# Altium PCB Dimmer-Sub-Board-v2.0.PcbDoc
Units mil, origin at the board's own origin, x right, y up, seen from the top; angles counter-clockwise.
Board outline 1968.5 x 4330.71 mil, 2 copper layers (Top Layer, Bottom Layer), stack 61.811 mil thick; 12 components, 10 nets, 37 pads, 0 vias.
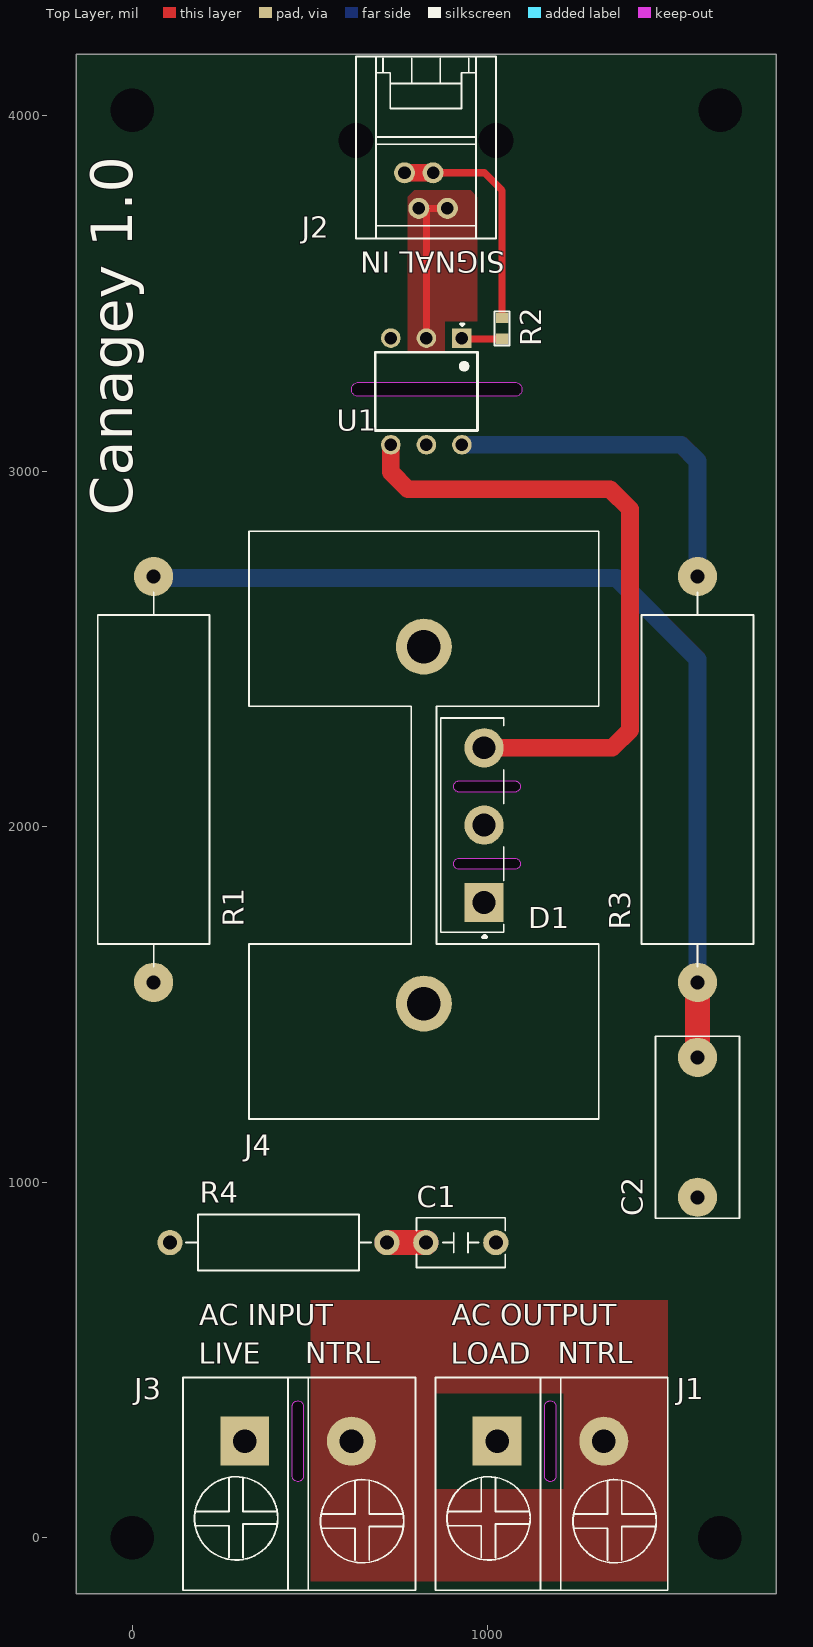
[diagram p0: Top Layer view]
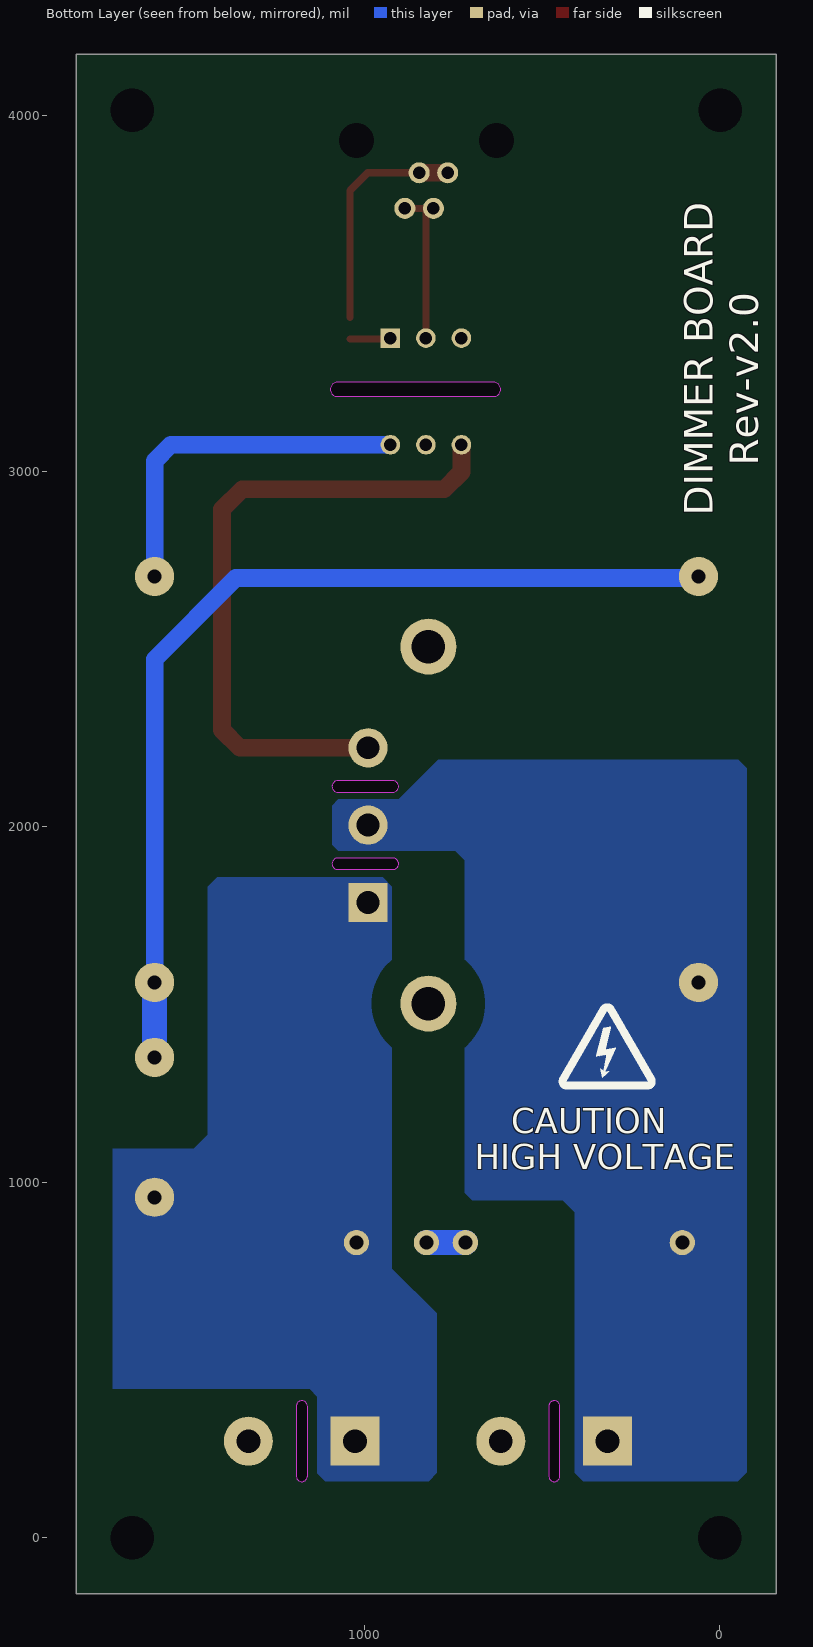
[diagram p1: Bottom Layer view, seen from below]
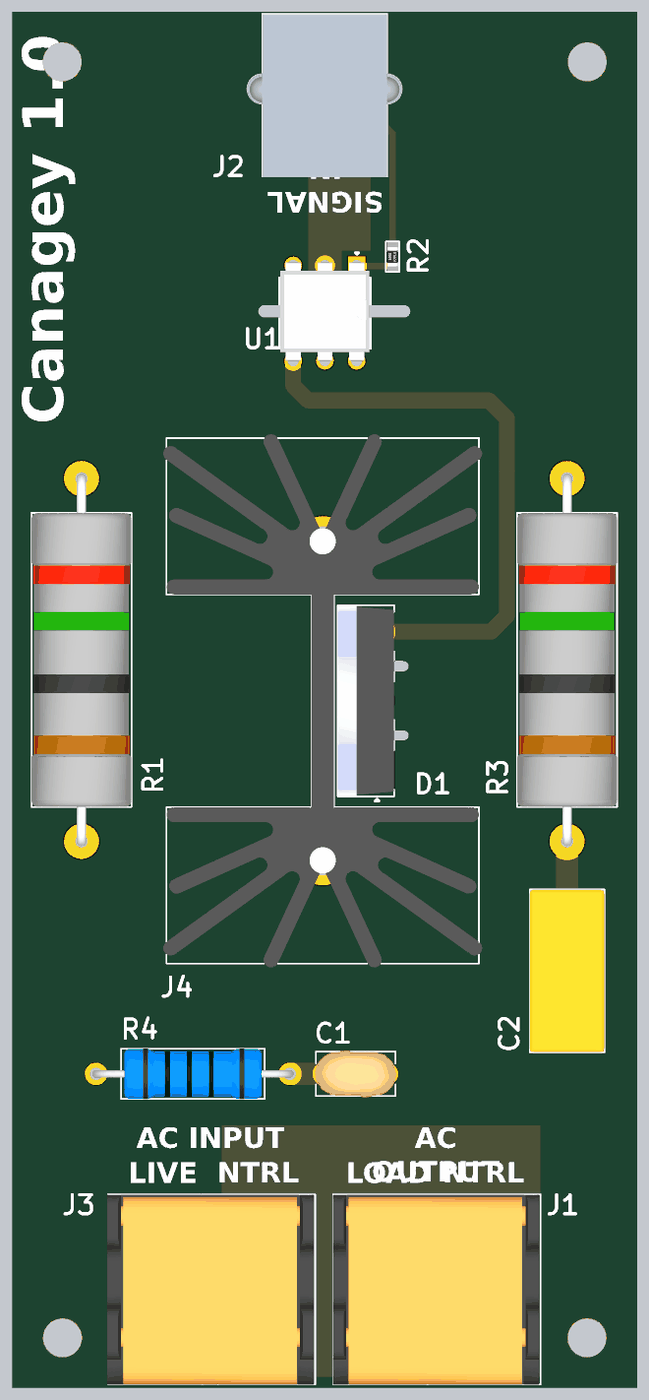
[diagram p2: 3D render of the assembled board from above, using the file's embedded part models]

## Layer stack, top to bottom
Top Solder: solder mask 0.394, Solder Resist, Dk 3.5
Top Layer: signal copper 1.378
Dielectric 1: dielectric 59.055, FR-4, Dk 4.6
Bottom Layer: signal copper 1.378
Bottom Solder: solder mask 0.394, Solder Resist, Dk 3.5

## Board outline
-157.85,-157.11 -157.85,4173.6 1810.66,4173.6 1810.66,-157.11
cut-out: 919.62,1880.49 cw(c919.62,1896.24) 903.87,1896.24 cw(c919.62,1896.24) 919.62,1911.99 1075.55,1911.99 cw(c1075.55,1896.24) 1091.3,1896.24 cw(c1075.55,1896.24) 1075.55,1880.49
cut-out: 919.62,2098.01 cw(c919.62,2113.76) 903.87,2113.76 cw(c919.62,2113.76) 919.62,2129.51 1075.55,2129.51 cw(c1075.55,2113.76) 1091.3,2113.76 cw(c1075.55,2113.76) 1075.55,2098.01
cut-out: 1191.5,174.22 cw(c1175.75,174.22) 1175.75,158.47 cw(c1175.75,174.22) 1160,174.22 1160,370.16 cw(c1175.75,370.16) 1175.75,385.9 cw(c1175.75,370.16) 1191.5,370.16
cut-out: 481.5,174.22 cw(c465.75,174.22) 465.75,158.47 cw(c465.75,174.22) 450,174.22 450,370.16 cw(c465.75,370.16) 465.75,385.9 cw(c465.75,370.16) 481.5,370.16
cut-out: 636.39,3211.03 cw(c636.39,3230.72) 616.7,3230.72 cw(c636.39,3230.72) 636.39,3250.4 1076.39,3250.4 cw(c1076.39,3230.72) 1096.07,3230.72 cw(c1076.39,3230.72) 1076.39,3211.03

## Design rules (kind name [scope] priority, off if disabled: settings)
BoardOutlineClearance [All] p1: gap=0 ignorepadtopadclearanceinfootprint=FALSE except(10: Arc-OutlineEdge SMDPad-OutlineEdge THPad-OutlineEdge Via-OutlineEdge Fill-OutlineEdge Poly-OutlineEdge)
Clearance Clearance_DIFF [InAnyDifferentialPair] p1: gap=10 ignorepadtopadclearanceinfootprint=FALSE except(6: Arc-SMDPad Track-SMDPad SMDPad-SMDPad; 7: Arc-Track Arc-Fill Track-Track Track-Via Track-Fill Track-Region Track-Text SMDPad-Fill SMDPad-Region THPad-THPad Fill-Fill; 8: Region-Region; 20: THPad-Poly Fill-Poly Poly-Poly Poly-Region)
Clearance [All] p2: gap=10 ignorepadtopadclearanceinfootprint=FALSE except(4: SMDPad-SMDPad; 6: Arc-SMDPad Track-SMDPad; 7: Arc-Track Arc-Fill Track-Track Track-Via Track-Fill Track-Region Track-Text SMDPad-Fill SMDPad-Region THPad-THPad Fill-Fill; 8: Region-Region; 20: THPad-Poly Fill-Poly Poly-Poly Poly-Region)
DiffPairsRouting DIFF_CAN1 [InDifferentialPairClass('DIFF_CAN')] p1: maxlimit=7 minlimit=7 mostfreqgap=7 toplayer_minwidth=7 toplayer_maxwidth=7 toplayer_prefwidth=7 bottomlayer_minwidth=7 bottomlayer_maxwidth=7 bottomlayer_prefwidth=7 impedanceprofiledriven=TRUE impedanceprofileid={AF431588-A3C0-40A6-A26B-CB03469C8758} impedanceprofilevalue=120.000000 maxuncoupledlength=500
DiffPairsRouting DIFF_RS485 [InDifferentialPairClass('DIFF_RS485')] p2: maxlimit=7 minlimit=7 mostfreqgap=7 toplayer_minwidth=7 toplayer_maxwidth=7 toplayer_prefwidth=7 bottomlayer_minwidth=7 bottomlayer_maxwidth=7 bottomlayer_prefwidth=7 impedanceprofiledriven=TRUE impedanceprofileid={AF431588-A3C0-40A6-A26B-CB03469C8758} impedanceprofilevalue=120.000000 maxuncoupledlength=500
HoleSize [All] p1: absolutevalues=TRUE maxlimit=137.8 minlimit=1 maxpercent=80.000 minpercent=20.000
MinimumSolderMaskSliver [All] p1: minsoldermaskwidth=0
PolygonConnect [All] p1: connectstyle=Direct reliefconductorwidth=10 reliefentries=4 polygonreliefangle="90 Angle" airgapwidth=10
RoutingVias [All] p1: holewidth=11.81 width=23.62 viastyle="Through Hole" minholewidth=7.87 minwidth=15.75 maxholewidth=11.81 maxwidth=23.62
SilkToSilkClearance [All] p1: silktosilkclearance=0
SilkToSolderMaskClearance [IsPad] p1: minsilkscreentomaskgap=0 clearancetoexposedcopper=TRUE
SolderMaskExpansion [All] p1: expansion=4 istentingtop=FALSE
SupplyNets "Schematic Supply Nets_2" [InNet('NEUTRAL')] p1: voltage=0.000
SupplyNets "Schematic Supply Nets_1" [InNet('LIVE')] p2: voltage=0.000
SupplyNets "Schematic Supply Nets" [InNet('LOAD')] p3: voltage=0.000
SupplyNets "Schematic Supply Nets_7" [InNet('GND')] p4: voltage=0.000
Width [All] p1: maxlimit=100 minlimit=4 preferedwidth=6 minimp=50.000000 maximp=50.000000 favimp=50.000000
25 further rules are at their usual default settings.

## Components (designator, comment, footprint, x,y, rotation, side; value= is the part's Value field where it differs from the comment)
C1 "10nF" KP103J2G0501 924,830.78 r180 top
C2 "47nF" MMKP473J2J1001 1590,1155 r270 top
D1 "BTA41-600BRG" TOP3 989.62,2005 r90 top locked
J1 "DBT50G-7.62-2P-BK-P" DBT50G-7.62-2P-BK-P 1176.26,272.19 r0 top locked
J2 "R-RJ11R04P-A802" R-RJ11R04P-A802 825.92,3835.28 r180 top locked
J3 "DBT50G-7.62-2P-BK-P" DBT50G-7.62-2P-BK-P 466.26,272.19 r0 top locked
J4 "XSD366-094" XSD366-094 820,2005 r270 top locked
R1 "450R" EWWR0006J450RT9 60,2133.66 r270 top
R2 "470R" Res-0603 1040,3402.44 r270 top
R3 "390R" EWWR0006J390RT9 1590,2133.66 r270 top
R4 "39R" MFR2WSJT-73-39R 411,830.78 r180 top
U1 "MOC3023M" "6 Pin Dip" 827,3225 r270 top

## Footprints (in the part's own frame and the unit in brackets; to place one, negate y for a bottom-side part, rotate by r counter-clockwise, add the part's x,y. Pads: shape width x height; smd on the part's side, far side on the other; paste and mask are expansions set on the pad)
"6 Pin Dip" [mm]
  rect 1.4x1.4 hole 0.9: 1(-3.81,2.54)
  round 1.4 hole 0.9: 2(-3.81,0) 3(-3.81,-2.54) 4(3.81,-2.54) 5(3.81,0) 6(3.81,2.54)
  silkscreen extent -4.83,-3.65 2.8,3.65, body extent -4.06,-3.56 3.81,3.56, height 4.8
DBT50G-7.62-2P-BK-P [mm]
  rect 3.5x3.5 hole 1.7: 1(-3.81,0)
  round 3.5 hole 1.7: 2(3.81,0)
  silkscreen extent -8.22,-10.65 8.38,4.55, body extent -8.25,-10.67 8.25,4.53, height 16.3
EWWR0006J390RT9 [mm]
  round 2.8 hole 1: 1(-14.5,0) 2(14.5,0)
  silkscreen extent -13.37,-4 13.37,4, body extent -14.87,-3.99 14.87,3.99, height 8
EWWR0006J450RT9 [mm]
  round 2.8 hole 1: 1(-14.5,0) 2(14.5,0)
  silkscreen extent -13.37,-4 13.37,4, body extent -14.87,-3.99 14.87,3.99, height 8
KP103J2G0501 [mm]
  round 1.8 hole 1 paste-2539.97 mask+0.05: 1(-2.5,0) 2(2.5,0)
  silkscreen extent -3.18,-1.78 3.17,1.78, body extent -3.25,-1.88 3.25,1.88, height 9.75
MFR2WSJT-73-39R [mm]
  round 1.8 hole 1 paste-2539.97 mask+0.051: 1(-7.75,0) 2(7.75,0)
  silkscreen extent -6.61,-2 6.6,2, body extent -8.05,-2 8.05,2, height 4.01
MMKP473J2J1001 [mm]
  round 2.8 hole 1: 1(-5,0) 2(5,0)
  silkscreen extent -6.5,-3 6.5,3, body extent -6.5,-3 6.5,3, height 12
R-RJ11R04P-A802 [mm]
  round 1.5 hole 0.9 paste-2539.97 mask+0.051: 1(1.53,-0.12) 2(0.51,2.42) 3(-0.51,-0.12) 4(-1.53,2.42)
  round 0 hole 2.5 unplated paste-2539.97: ""(-5,-2.42) ""(5,-2.42)
  silkscreen extent -5,-8.42 5,4.59, body extent -6.14,-8.37 6.14,4.63, height 14.55
Res-0603 [mil]
  rect 30x35 smd: 1(-30,0) 2(30,0)
  silkscreen extent -48,-21 48,21, body extent -31,-17 31,17, height 18
TOP3 [mm]
  rect 2.8x2.8 hole 1.63: 1(-5.525,0)
  round 2.8 hole 1.63: 2(0,0) 3(5.525,0)
  silkscreen extent -8.01,-1.4 7.65,3.1, body extent -7.65,-1.4 7.65,3.1, height 21.1
XSD366-094 [mm]
  round 4 hole 2.4 paste-2539.97 mask+0.102: 1(-12.75,0) 2(12.75,0)
  silkscreen extent -21,-12.5 21,12.5, body extent -21.31,-12.76 21.31,12.76, height 25.3

## Part data
C1: library part KP103J2G0501, "10nF -40℃~+100℃ ±5% 400V Plugin,P=5mm Polypropylene Film Capacitors (CBB) ROHS", LCSC Part Number=C3019055, Manufacturer=KYET, Package=Plugin,P=5mm, ComponentLink1Description=LCSC, ComponentLink1URL=https://www.lcsc.com/product-detail/Polypropylene-Film-Capacitors-CBB_KYET-KP103J2G0501_C3019055.html, Item Type=Capacitor, Manufacturer Part Number=KP103J2G0501
C2: library part MMKP473J2J1001, "47nF -40℃~+105℃ ±5% 630V Plugin,P=10mm Polypropylene Film Capacitors (CBB) ROHS", LCSC Part Number=C484939, Manufacturer=KYET, ComponentLink1Description="New link", ComponentLink1URL=https://www.lcsc.com/product-detail/Polypropylene-Film-Capacitors-CBB_KYET-MMKP473J2J1001_C484939.html, Item Type=Capacitor, Manufacturer Part Number=MMKP473J2J1001, Pricing="5=0.1166, 50=0.0957, 150=0.0852, 500=0.0684, 2500=0.0622, 5000=0.059 (USD)", Stock=4295, Supplier=LCSC
D1: "80mA 50mA 600V TOP-3 Thyristors (SCR)/Modules ROHS", LCSC Part Number=C9103, Manufacturer=STMicroelectronics, Package=TOP-3, ComponentLink1Description="LCSC Link", ComponentLink1URL=https://www.lcsc.com/product-detail/Thyristors-SCR-Modules_STMicroelectronics-BTA41-600BRG_C9103.html, Item Type=Thyristors, Manufacturer Part Number=BTA41-600BRG
J1 J3: "1x2P Corner With Cover Plate 2 1 7.62mm -40℃~+105℃ 20A 300V Black 12~22 Straight Needle Plugin,P=7.62mm Barrier Terminal Blocks ROHS", LCSC Part Number=C496127, Manufacturer=DORABO, Package=Plugin,P=7.62mm, ComponentLink1Description=LCSC, ComponentLink1URL=https://www.lcsc.com/product-detail/Barrier-Terminal-Blocks_DORABO-DBT50G-7-62-2P-BK-P_C496127.html, Item Type="Terminal Block", Manufacturer Part Number=DBT50G-7.62-2P-BK-P
J2: "RJ11Receptacle 1 Plugin Ethernet Connectors / Modular Connectors (RJ45 RJ11) ROHS", LCSC Part Number=C189737, Manufacturer="Ckmtw(Shenzhen Cankemeng)", Package=Plugin, ComponentLink1Description=LCSC, ComponentLink1URL=https://www.lcsc.com/product-detail/Ethernet-Connectors-Modular-Connectors-RJ45-RJ11_Ckmtw-Shenzhen-Cankemeng-R-RJ11R04P-A802_C189737.html, Item Type="(RJ45 RJ11)", Manufacturer Part Number=R-RJ11R04P-A802
J4: "42*25*25MM Heat sink/heatsink", LCSC Part Number=C286227, Manufacturer=XSD, Package=Custom, ComponentLink1Description=LCSC, ComponentLink1URL=https://www.lcsc.com/product-detail/Heat-sink-heatsink_XSD-XSD366-094_C286227.html, Item Type=Heatsink, Manufacturer Part Number=XSD366-094
R1: library part EWWR0006J450RT9, "Wirewound Resistors 450Ω 6W ±250ppm/℃ ±5% Plugin,D8xL23.5mm Through Hole Resistors ROHS", LCSC Part Number=C348984, Manufacturer=RESI, Package=Plugin,D8xL23.5mm, ComponentLink1Description=LCSC, ComponentLink1URL=https://www.lcsc.com/product-detail/Through-Hole-Resistors_RESI-EWWR0006J450RT9_C348984.html, Item Type=Resistor, Manufacturer Part Number=EWWR0006J450RT9
R2: library part RC0603FR-07470RL, "RES 470 OHM 1% 1/10W 0603", Case Code (Imperial)=0603, Case Code (Metric)=1608, LCSC Part Number=C114669, Manufacturer=Yageo, Max Operating Temperature=155°C, Max Power Dissipation=100mW, Min Operating Temperature=-55°C, Package Quantity=1, Resistance Tolerance=1%, Resistor Type="Thick Film", Supplier Part Number 1=311-470HRCT-ND, Temperature Coefficient=100ppm/°C, Voltage Rating=50V, Working Voltage=75V, Case/Package=0603, Category="Chip SMD Resistors", ComponentLink1Description=https://datasheet.ciiva.com/11808/0900766b80f96399-11808177.pdf?src-supplier=RSComponents, ComponentLink1URL=https://datasheet.ciiva.com/11808/0900766b80f96399-11808177.pdf?src-supplier=RSComponents, ComponentLink2Description=https://datasheet.ciiva.com/7746/1738695-7746359.pdf?src-supplier=Element14, ComponentLink2URL=https://datasheet.ciiva.com/7746/1738695-7746359.pdf?src-supplier=Element14, ComponentLink3Description=https://datasheet.ciiva.com/7746/1738695-7746360.pdf?src-supplier=Element14, ComponentLink3URL=https://datasheet.ciiva.com/7746/1738695-7746360.pdf?src-supplier=Element14, ComponentLink4Description=https://datasheet.ciiva.com/7660/1868787-7660793.pdf?src-supplier=Element14, ComponentLink4URL=https://datasheet.ciiva.com/7660/1868787-7660793.pdf?src-supplier=Element14, ComponentLink5Description=https://datasheet.ciiva.com/46440/1868787-46440907.pdf?src-supplier=Element14, ComponentLink5URL=https://datasheet.ciiva.com/46440/1868787-46440907.pdf?src-supplier=Element14, ComponentLink6Description=https://datasheet.ciiva.com/2454/pyu-r-int-thick-7-2454012.pdf?src-supplier=Digi-Key, ComponentLink6URL=https://datasheet.ciiva.com/2454/pyu-r-int-thick-7-2454012.pdf?src-supplier=Digi-Key, ComponentLink7Description=https://datasheet.ciiva.com/2454/pyu-r-int-thick-7-2454013.pdf?src-supplier=Digi-Key, ComponentLink7URL=https://datasheet.ciiva.com/2454/pyu-r-int-thick-7-2454013.pdf?src-supplier=Digi-Key, ComponentLink8Description=https://datasheet.ciiva.com/2454/pyu-r-int-thick-7-2454014.pdf?src-supplier=Digi-Key, ComponentLink8URL=https://datasheet.ciiva.com/2454/pyu-r-int-thick-7-2454014.pdf?src-supplier=Digi-Key, Construction=Rectangular, Depth=0.8mm, Features="Moisture Resistant", Height=0.022inch, Lead Free="Lead Free", Length=1.6mm, Manufacturer Part Number=RC0603FR-07470RL, Military Standard=Not, Number of Terminations=2, Packaging="Tape and Reel", Power Rating=100mW, Pricing 1="1=0.10000, 10=0.02400, 100=0.00970, 1000=0.00436, 2500=0.00378 (USD)", REACH SVHC="No SVHC", Resistance=470R, RoHS=Yes, RoHS Compliant=Yes, Series=RC, Stock 1=154083, Supplier 1=Digi-Key, Technology="THICK FILM", Termination=SMD/SMT, Tolerance=1%, Width=0.031inch
R3: library part EWWR0006J390RT9, "Wirewound Resistors 390Ω 6W ±250ppm/℃ ±5% Plugin,D8xL23.5mm Through Hole Resistors ROHS", LCSC Part Number=C348979, Manufacturer=RESI, Package=Plugin,D8xL23.5mm, ComponentLink1Description=LCSC, ComponentLink1URL=https://www.lcsc.com/product-detail/Through-Hole-Resistors_RESI-EWWR0006J390RT9_C348979.html, Item Type=Resistor, Manufacturer Part Number=EWWR0006J390RT9
R4: library part MFR2WSJT-73-39R, "Metal Film Resistors 39Ω 2W ±5% Plugin,D4.5xL11.5mm Through Hole Resistors ROHS", LCSC Part Number=C176578, Manufacturer=YAGEO, Package=Plugin,D4.5xL11.5mm, ComponentLink1Description=LCSC, ComponentLink1URL=https://www.lcsc.com/product-detail/Through-Hole-Resistors_YAGEO-MFR2WSJT-73-39R_C176578.html, Item Type=Resistor, Manufacturer Part Number=MFR2WSJT-73-39R
U1: "OPTOISOLATOR 4.17KV TRIAC 6DIP", LCSC Part Number=C5240, Manufacturer="ON Semiconductor / Fairchild", ComponentLink1Description=https://datasheet.ciiva.com/15118/getdatasheetpartid-110426-15118245.pdf?src-supplier=Verical, ComponentLink1URL=https://datasheet.ciiva.com/15118/getdatasheetpartid-110426-15118245.pdf?src-supplier=Verical, ComponentLink2Description=https://datasheet.ciiva.com/8074/1806097-8074079.pdf?src-supplier=Element14, ComponentLink2URL=https://datasheet.ciiva.com/8074/1806097-8074079.pdf?src-supplier=Element14, ComponentLink3Description=https://datasheet.ciiva.com/8084/moc3023m-8084955.pdf?src-supplier=Avnet, ComponentLink3URL=https://datasheet.ciiva.com/8084/moc3023m-8084955.pdf?src-supplier=Avnet, ComponentLink4Description=https://datasheet.ciiva.com/2092/moc3010m-2092979.pdf?src-supplier=Digikey, ComponentLink4URL=https://datasheet.ciiva.com/2092/moc3010m-2092979.pdf?src-supplier=Digikey, Item Type=IC, Manufacturer Part Number=MOC3023M, Pricing="1=0.215, 200=0.205, 750=0.196, 2500=0.19, 10000=0.176 (USD)", RoHS=Yes, Stock=46500, Supplier="Future Electronics"

## Free pads (board coordinates)
  round 0 hole 122.05: MH1(-0.74,4015.75) MH1(0,0) MH1(1652.81,0) MH1(1653.54,4015.75)

## Nets (pads, with @x,y where several pads share a name; then routed paths per layer and width w, separated by ;. In a path a pad name is that pad's centre, name@x,y a point inside that pad or via, vN(x,y) a via of type N, cw(c..) or ccw(c..) an arc to the next point about the centre after c; other vN are vias at no path point)
GND: J2.2 J2.4 U1.2 | length 445.3
  Top Layer w20: J2.2 J2.2@827,3740 ; U1.2 J2.2@827,3740 ; J2.4 J2.2@827,3740
LIVE: D1.2 J3.1 R1.2 R4.2
LOAD: C1.1 C2.2 D1.1 J1.1
NetC1_2: C1.2 R4.1 | length 218.9
  Top Layer w70: R4.1 C1.2
  Bottom Layer w70: R4.1 C1.2
NetC2_1: C2.1 R1.1 R3.2 | length 2940.7
  Top Layer w70: C2.1 R3.2@1590,1548.03
  Bottom Layer w50: R1.1@60,2700 1361.93,2700 1590,2471.93 R3.2
  Bottom Layer w70: C2.1 R3.2
NetD1_3: D1.3 U1.4 | length 1845.8
  Top Layer w50: U1.4 727,2998.1 775.1,2950 1343.62,2950 1400.26,2893.36 1400.26,2272.49 1350.3,2222.52 D1.3
NetR2_2: R2.2 U1.1 | length 114.1
  Top Layer w20: U1.1 929.56,3372.44 R2.2
NetR3_1: R3.1 U1.6 | length 1006.8
  Bottom Layer w50: U1.6 1544.39,3075 1590,3029.39 R3.1
NEUTRAL: J1.2 J3.2
TRIG: J2.1 J2.3 R2.1 | length 652.5
  Top Layer w20: J2.3 990.71,3840 1040,3790.71 R2.1@1040,3432.96
  Top Layer w50: J2.1 J2.3
pads on no net: J2. J4.1 J4.2 U1.3 U1.5
copper on no net: | length 0

## Polygon pours and split planes (outlines as drawn)
GND on Top Layer "GND_L01_P003" (solid, remove dead copper, pour order 3): 970.7,3335.24 970.7,3771.87 952.2,3790.37 792.9,3790.37 774.97,3772.44 774.97,3335.24
NEUTRAL on Top Layer "NEUTRAL_L01_P001" (solid, pour order 1): 502.01,668.6 502.01,-122.05 1506.18,-122.05 1506.18,668.6
LOAD on Bottom Layer "LOAD_L02_P000" (solid, pour order 0): 922.6,1831.96 948.91,1858.27 1413.39,1858.27 1440,1831.65 1440,1134.11 1480,1094.11 1708.11,1094.11 1708.11,420 1154.41,420 1132.18,397.77 1132.18,182.4 1109.78,160 819.22,160 796.18,183.04 796.18,631.34 922.6,757.76
LIVE on Bottom Layer "LIVE_L02_P002" (solid, pour order 2): 1073.05,1933.07 1090.55,1950.57 1090.55,2060.12 1073.05,2077.62 903.65,2077.62 792.39,2188.87 -52.17,2188.87 -75.91,2165.13 -75.91,185.34 -50.57,160 384.31,160 408.02,183.72 408.02,915.78 442.24,950 696.11,950 717.4,971.29 717.4,1905.62 744.85,1933.07

## Other copper
Top Layer:
  pour cut-out: 852.64,138.08 852.64,406.3 1212.03,406.3 1212.03,138.08
Bottom Layer:
  pour cut-out: 659.53,2506.97 ccw(c820,2506.97) 820,2346.5 ccw(c820,2506.97) 980.47,2506.97 ccw(c820,2506.97) 820,2667.44 ccw(c820,2506.97)
  pour cut-out: 659.53,1503.03 ccw(c820,1503.03) 820,1342.56 ccw(c820,1503.03) 980.47,1503.03 ccw(c820,1503.03) 820,1663.5 ccw(c820,1503.03)
  pour cut-out: 1207.78,272.19 ccw(c1326.26,272.19) 1326.26,153.71 ccw(c1326.26,272.19) 1444.74,272.19 ccw(c1326.26,272.19) 1326.26,390.66 ccw(c1326.26,272.19)
  pour cut-out: 1653.54,4133.86 cw(c1653.54,4015.75) 1771.65,4015.75 cw(c1653.54,4015.75) 1653.54,3897.64 cw(c1653.54,4015.75) 1535.43,4015.75 cw(c1653.54,4015.75)
  pour cut-out: 1770.92,0 cw(c1652.81,0) 1652.81,-118.11 cw(c1652.81,0) 1534.7,0 cw(c1652.81,0) 1652.81,118.11 cw(c1652.81,0)
  pour cut-out: -118.11,0 ccw(c0,0) 0,-118.11 ccw(c0,0) 118.11,0 ccw(c0,0) 0,118.11 ccw(c0,0)
  pour cut-out: -118.85,4015.75 ccw(c-0.74,4015.75) -0.74,3897.64 ccw(c-0.74,4015.75) 117.37,4015.75 ccw(c-0.74,4015.75) -0.74,4133.86 ccw(c-0.74,4015.75)
Multi-Layer:
  pour cut-out: 701.52,2506.97 ccw(c820,2506.97) 820,2388.49 ccw(c820,2506.97) 938.48,2506.97 ccw(c820,2506.97) 820,2625.44 ccw(c820,2506.97)
  pour cut-out: 701.52,1503.03 ccw(c820,1503.03) 820,1384.56 ccw(c820,1503.03) 938.48,1503.03 ccw(c820,1503.03) 820,1621.51 ccw(c820,1503.03)
  pour cut-out: 1653.54,4133.86 cw(c1653.54,4015.75) 1771.65,4015.75 cw(c1653.54,4015.75) 1653.54,3897.64 cw(c1653.54,4015.75) 1535.43,4015.75 cw(c1653.54,4015.75)
  pour cut-out: 1770.92,0 cw(c1652.81,0) 1652.81,-118.11 cw(c1652.81,0) 1534.7,0 cw(c1652.81,0) 1652.81,118.11 cw(c1652.81,0)
  pour cut-out: -118.85,4015.75 ccw(c-0.74,4015.75) -0.74,3897.64 ccw(c-0.74,4015.75) 117.37,4015.75 ccw(c-0.74,4015.75) -0.74,4133.86 ccw(c-0.74,4015.75)
  pour cut-out: -118.11,0 ccw(c0,0) 0,-118.11 ccw(c0,0) 118.11,0 ccw(c0,0) 0,118.11 ccw(c0,0)

## Silkscreen, mask and mechanical layers (free items; w line width, h text height)
Top Overlay:
  text "SIGNAL IN" at 1047.7,3637.08 h100 r180
  text "Canagey 1.0" at 38.82,2875.28 h200 r90
  text "AC INPUT" at 188.49,579.01 h100
  text "AC OUTPUT" at 898.49,579.01 h100
  text "NTRL" at 486.91,472.13 h100
  text "NTRL" at 1196.91,472.13 h100
  text "LIVE" at 186.41,470.88 h100
  text "LOAD" at 896.41,470.88 h100
Bottom Overlay:
  drawing of 2 lines, arcs and shapes, not listed
  text "Rev-v2.0" at -108.33,3015.41 h80 r270
  text "DIMMER BOARD" at 20.03,2875.53 h80 r270
  text "CAUTION" at 587.58,1115.14 h120
  text "HIGH VOLTAGE" at 689.91,1013.41 h120
Board Outline:
  lines w5: 450,174.22 ccw(c465.75,174.22) 465.75,158.47 ccw(c465.75,174.22) 481.5,174.22 481.5,364.22 481.5,370.16 ccw(c465.75,370.16) 465.75,385.9 ccw(c465.75,370.16) 450,370.16 450,364.22 450,174.22 ; 616.7,3230.72 cw(c636.39,3230.72) 636.39,3250.4 1076.39,3250.4 cw(c1076.39,3230.72) 1096.07,3230.72 cw(c1076.39,3230.72) 1076.39,3211.03 636.39,3211.03 cw(c636.39,3230.72) 616.7,3230.72 ; 903.87,1896.24 cw(c919.62,1896.24) 919.62,1911.99 1075.55,1911.99 cw(c1075.55,1896.24) 1091.3,1896.24 cw(c1075.55,1896.24) 1075.55,1880.49 919.62,1880.49 cw(c919.62,1896.24) 903.87,1896.24 ; 903.87,2113.76 ccw(c919.62,2113.76) 919.62,2098.01 1075.55,2098.01 ccw(c1075.55,2113.76) 1091.3,2113.76 ccw(c1075.55,2113.76) 1075.55,2129.51 919.62,2129.51 ccw(c919.62,2113.76) 903.87,2113.76 ; 1160,174.22 ccw(c1175.75,174.22) 1175.75,158.47 ccw(c1175.75,174.22) 1191.5,174.22 1191.5,364.22 1191.5,370.16 ccw(c1175.75,370.16) 1175.75,385.9 ccw(c1175.75,370.16) 1160,370.16 1160,364.22 1160,174.22
  lines w10: -157.85,-157.11 1810.66,-157.11 1810.66,4173.6 -157.85,4173.6 -157.85,-157.11
Fabrication:
  drawing of 191 lines, arcs and shapes, not listed
  text "Layer" at 2595.34,4080 h60
  text "Name" at 3005.26,4080 h60
  text "Material" at 3935,4080 h60
  text "Thickness" at 4794.77,4080 h60
  text "Constant" at 5444.6,4080 h60
  text "Board Layer Stack" at 6014.46,4080 h60
  text "Top Overlay" at 3005.26,3960 h60
  text "Top Solder" at 3005.26,3840 h60
  text "Solder Resist" at 3935,3840 h60
  text "0.010mm" at 4794.77,3840 h60
  text "3.5" at 5444.6,3840 h60
  text "1" at 2595.34,3720 h60
  text "Top Layer" at 3005.26,3720 h60
  text "0.035mm" at 4794.77,3720 h60
  text "Dielectric 1" at 3005.26,3600 h60
  text "FR-4" at 3935,3600 h60
  text "1.500mm" at 4794.77,3600 h60
  text "4.6" at 5444.6,3600 h60
  text "2" at 2595.34,3480 h60
  text "Bottom Layer" at 3005.26,3480 h60
  text "0.035mm" at 4794.77,3480 h60
  text "Bottom Solder" at 3005.26,3360 h60
  text "Solder Resist" at 3935,3360 h60
  text "0.010mm" at 4794.77,3360 h60
  text "3.5" at 5444.6,3360 h60
  text "Bottom Overlay" at 3005.26,3240 h60
  text "Total board thickness:" at 2595.34,3120 h60
  text "1.590mm" at 4794.77,3120 h60
Drill Drawing:
  circle w10: c-91.48,5893.33 r33.33
  lines w10: -124.82,4976.67 -108.15,4976.67 -91.48,4960 -74.82,4976.67 -58.15,4976.67 -74.82,4993.33 -58.15,5010 -74.82,5010 -91.48,5026.67 -108.15,5010 -124.82,5010 -108.15,4993.33 -124.82,4976.67 ; -124.82,5110 -91.48,5126.67 -58.15,5110 -74.82,5143.33 -58.15,5176.67 -91.48,5160 -124.82,5176.67 -108.15,5143.33 -124.82,5110 ; -124.82,5260 -124.82,5276.67 -108.15,5293.33 -124.82,5310 -124.82,5326.67 -108.15,5326.67 -91.48,5310 -74.82,5326.67 -58.15,5326.67 -58.15,5310 -74.82,5293.33 -58.15,5276.67 -58.15,5260 -74.82,5260 -91.48,5276.67 -108.15,5260 -124.82,5260 ; -124.82,5410 -58.15,5410 -58.15,5476.67 -124.82,5476.67 -124.82,5410 ; -124.82,5626.67 -58.15,5626.67 -91.48,5560 -124.82,5626.67 ; -124.82,5726.67 -108.15,5726.67 -108.15,5710 -74.82,5710 -74.82,5726.67 -58.15,5726.67 -58.15,5760 -74.82,5760 -74.82,5776.67 -108.15,5776.67 -108.15,5760 -124.82,5760 -124.82,5726.67 ; -124.82,6010 -124.82,6026.67 -108.15,6043.33 -124.82,6060 -124.82,6076.67 -108.15,6076.67 -91.48,6060 -74.82,6076.67 -58.15,6076.67 -58.15,6060 -74.82,6043.33 -58.15,6026.67 -58.15,6010 -74.82,6010 -91.48,6026.67 -108.15,6010 -124.82,6010 ; -111.48,5273.33 -111.48,5283.33 -101.48,5293.33 -111.48,5303.33 -111.48,5313.33 -101.48,5313.33 -91.48,5303.33 -81.48,5313.33 -71.48,5313.33 -71.48,5303.33 -81.48,5293.33 -71.48,5283.33 -71.48,5273.33 -81.48,5273.33 -91.48,5283.33 -101.48,5273.33 -111.48,5273.33
  lines w15: -184.61,4915 10916.29,4915 ; -184.61,6115 10916.29,6115 ; 366.27,4765 366.27,6265 ; 906.13,4765 906.13,6265 ; 2045.79,4765 2045.79,6265 ; 2551.67,4765 2551.67,6265 ; 3285.47,4765 3285.47,6265 ; 4785.02,4765 4785.02,6265 ; 5374.87,4765 5374.87,6265 ; 6120.67,4765 6120.67,6265 ; 7350.31,4765 7350.31,6265 ; 8204.07,4765 8204.07,6265 ; 9537.68,4765 9537.68,6265 ; -184.61,4765 10916.29,4765 10916.29,6265 -184.61,6265 -184.61,4765
  text "Symbol" at -94.61,6160 h72
  text "Count" at 411.27,6160 h72
  text "Hole Size" at 951.13,6160 h72
  text "Plated" at 2090.79,6160 h72
  text "Hole Type" at 2596.67,6160 h72
  text "Drill Layer Pair" at 3330.47,6160 h72
  text "Via/Pad" at 4830.02,6160 h72
  text "Pad Shape" at 5419.87,6160 h72
  text "Template" at 6165.67,6160 h72
  text "Description" at 7395.31,6160 h72
  text "Hole Tolerance (+)" at 8249.07,6160 h72
  text "Hole Tolerance (-)" at 9582.68,6160 h72
  text "2" at 411.27,6010 h60
  text "94.49mil (2.400mm)" at 951.13,6010 h60
  text "PTH" at 2090.79,6010 h60
  text "Round" at 2596.67,6010 h60
  text "Top Layer - Bottom Layer" at 3330.47,6010 h60
  text "Pad" at 4830.02,6010 h60
  text "Rounded" at 5419.87,6010 h60
  text "c400h240m420mx420p0" at 6165.67,6010 h60
  text "2" at 411.27,5860 h60
  text "98.43mil (2.500mm)" at 951.13,5860 h60
  text "NPTH" at 2090.79,5860 h60
  text "Round" at 2596.67,5860 h60
  text "Top Layer - Bottom Layer" at 3330.47,5860 h60
  text "Pad" at 4830.02,5860 h60
  text "Rounded" at 5419.87,5860 h60
  text "c0hn250p0" at 6165.67,5860 h60
  text "3" at 411.27,5710 h60
  text "64.17mil (1.630mm)" at 951.13,5710 h60
  text "PTH" at 2090.79,5710 h60
  text "Round" at 2596.67,5710 h60
  text "Top Layer - Bottom Layer" at 3330.47,5710 h60
  text "Pad" at 4830.02,5710 h60
  text "(Mixed)" at 5419.87,5710 h60
  text "(Mixed)" at 6165.67,5710 h60
  text "4" at 411.27,5560 h60
  text "35.43mil (0.900mm)" at 951.13,5560 h60
  text "PTH" at 2090.79,5560 h60
  text "Round" at 2596.67,5560 h60
  text "Top Layer - Bottom Layer" at 3330.47,5560 h60
  text "Pad" at 4830.02,5560 h60
  text "Rounded" at 5419.87,5560 h60
  text "c150h90m160mx160p0" at 6165.67,5560 h60
  text "4" at 411.27,5410 h60
  text "66.93mil (1.700mm)" at 951.13,5410 h60
  text "PTH" at 2090.79,5410 h60
  text "Round" at 2596.67,5410 h60
  text "Top Layer - Bottom Layer" at 3330.47,5410 h60
  text "Pad" at 4830.02,5410 h60
  text "(Mixed)" at 5419.87,5410 h60
  text "(Mixed)" at 6165.67,5410 h60
  text "4" at 411.27,5260 h60
  text "122.05mil (3.100mm)" at 951.13,5260 h60
  text "PTH" at 2090.79,5260 h60
  text "Round" at 2596.67,5260 h60
  text "Top Layer - Bottom Layer" at 3330.47,5260 h60
  text "Pad" at 4830.02,5260 h60
  text "Rounded" at 5419.87,5260 h60
  text "c0h310" at 6165.67,5260 h60
  text "6" at 411.27,5110 h60
  text "35.43mil (0.900mm)" at 951.13,5110 h60
  text "PTH" at 2090.79,5110 h60
  text "Round" at 2596.67,5110 h60
  text "Top Layer - Bottom Layer" at 3330.47,5110 h60
  text "Pad" at 4830.02,5110 h60
  text "(Mixed)" at 5419.87,5110 h60
  text "(Mixed)" at 6165.67,5110 h60
  text "10" at 411.27,4960 h60
  text "39.37mil (1.000mm)" at 951.13,4960 h60
  text "PTH" at 2090.79,4960 h60
  text "Round" at 2596.67,4960 h60
  text "Top Layer - Bottom Layer" at 3330.47,4960 h60
  text "Pad" at 4830.02,4960 h60
  text "Rounded" at 5419.87,4960 h60
  text "(Mixed)" at 6165.67,4960 h60
  text "35 Total" at 411.27,4810 h60

## Dimensions
1810.66,4173.6 to 1810.66,-157.11 on Dimensions
-157.85,4173.6 to 1810.66,4173.6 on Dimensions